# Altium PCB module-SMD-lora.PcbDoc
Units mm, origin at the board's own origin, x right, y up, seen from the top; angles counter-clockwise.
Board outline 20 x 20 mm, 4 copper layers (Top Layer, Int1, Int2, Bottom Layer), stack 1.546 mm thick; 29 components, 50 nets, 157 pads, 108 vias.
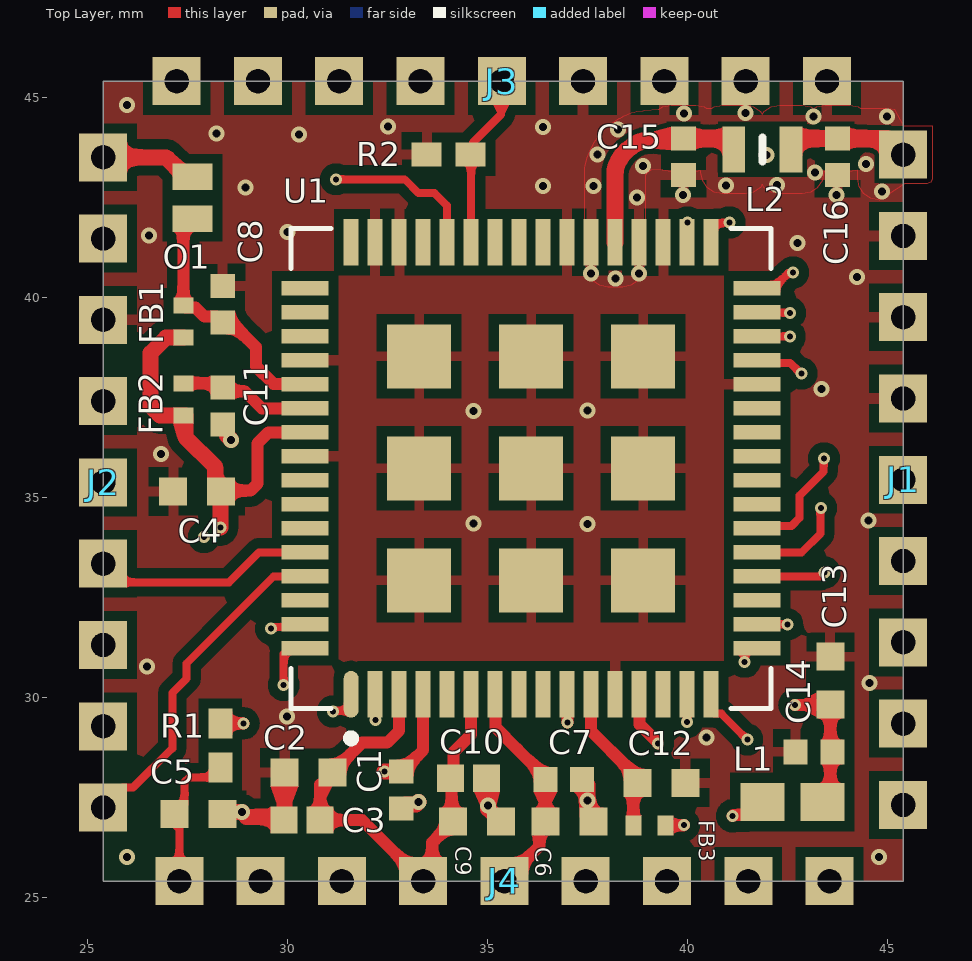
[diagram p0: Top Layer view]
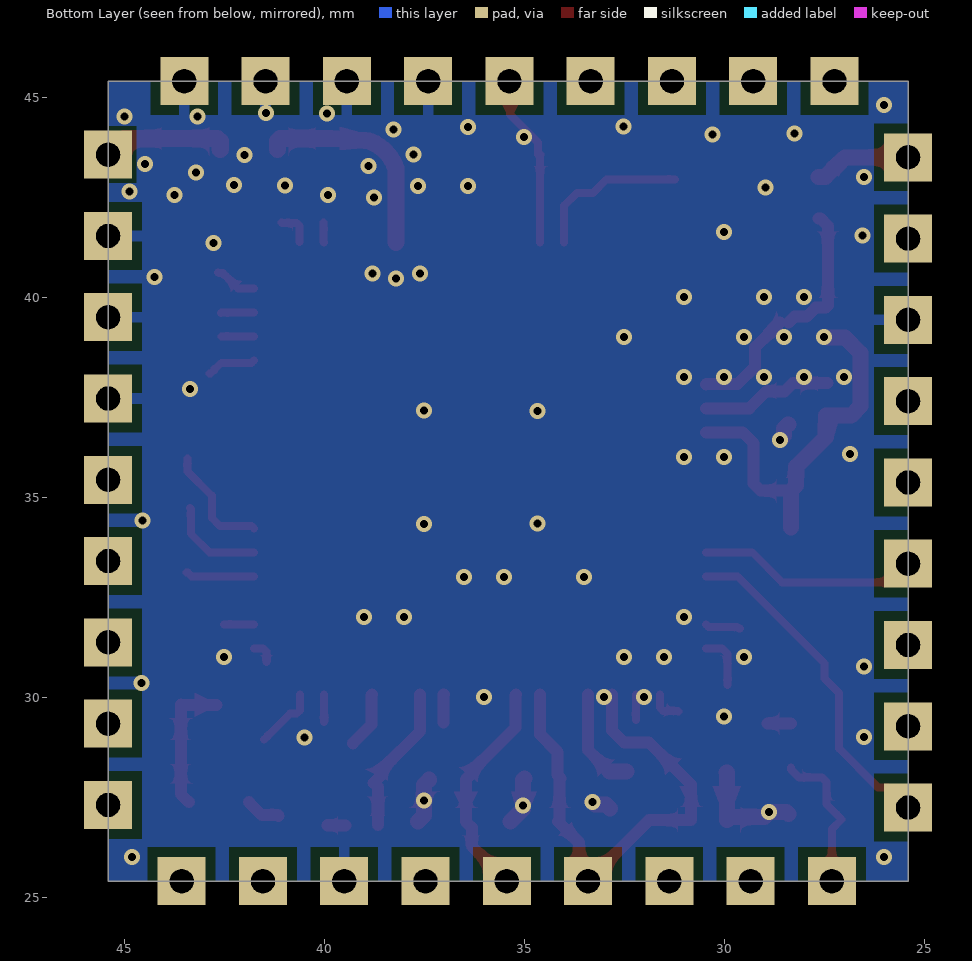
[diagram p1: Bottom Layer view, seen from below]
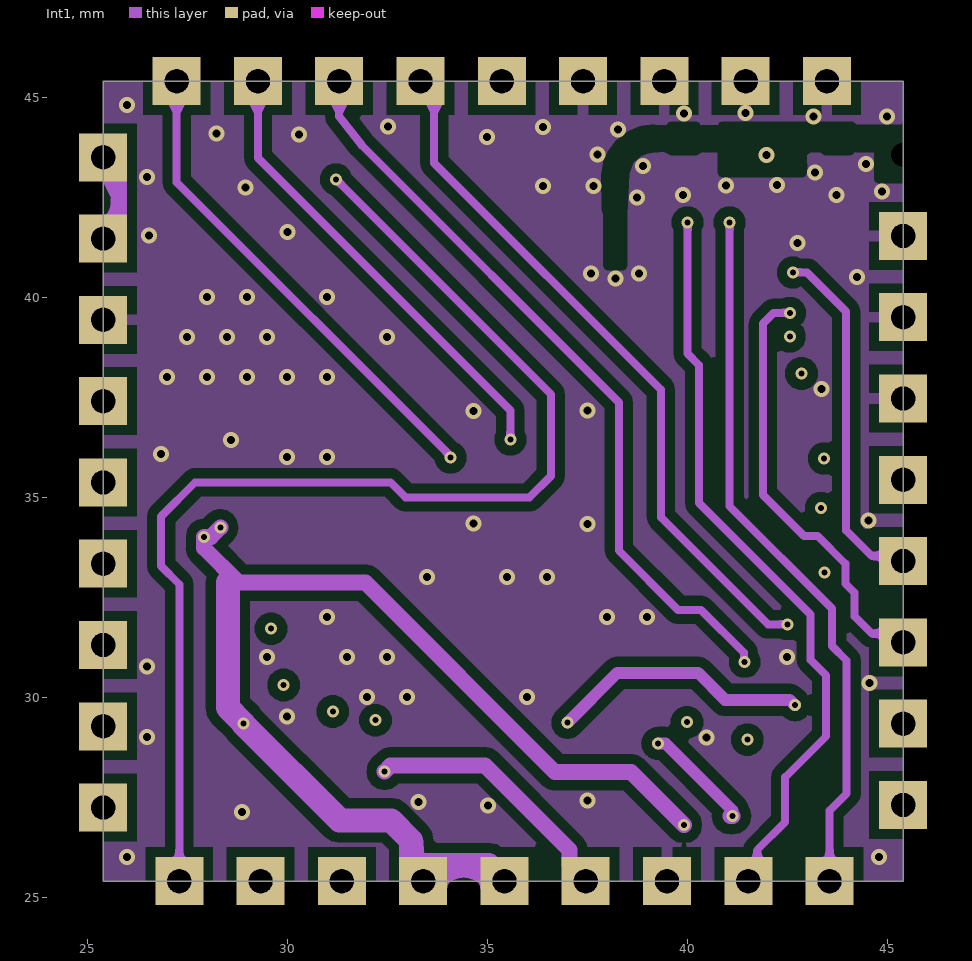
[diagram p2: Int1]
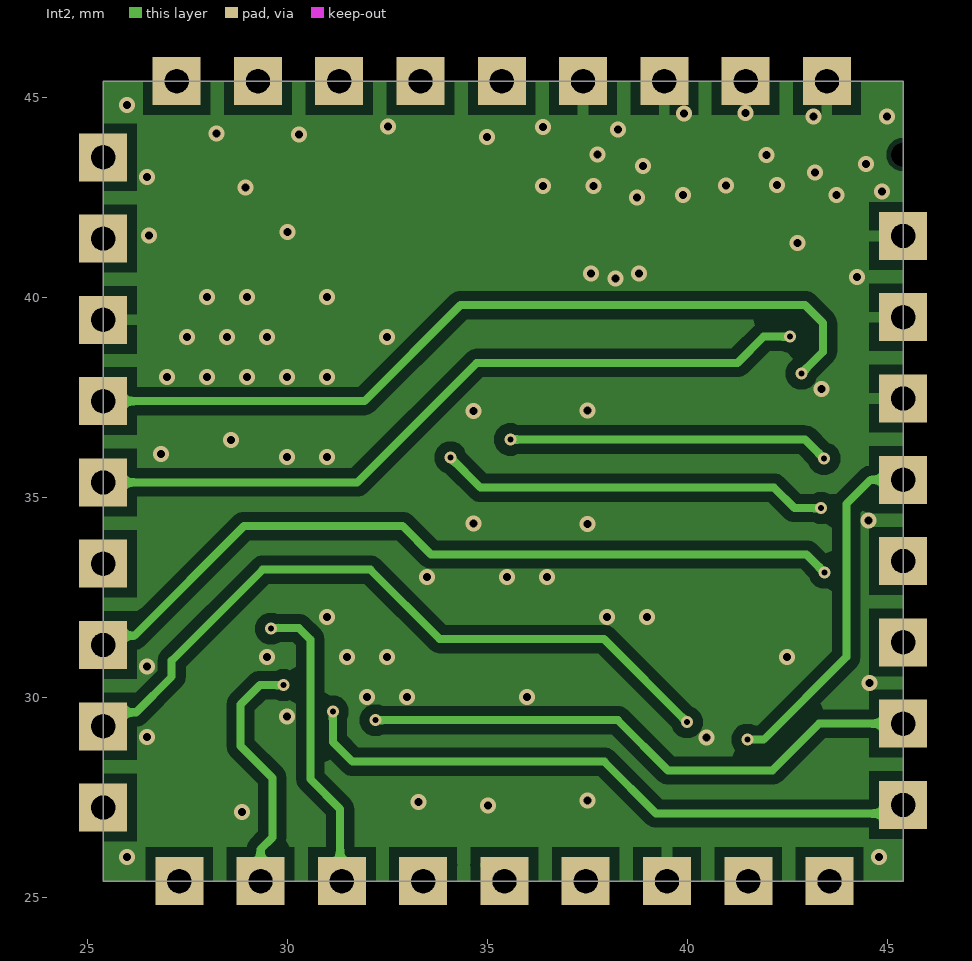
[diagram p3: Int2]

## Layer stack, top to bottom
Top Solder: solder mask 0.0254, SM-003, Dk 4
Top Layer: signal copper 0.035
Dielectric 1: prepreg 0.0705, PP-017, Dk 4
Int1: signal copper 0.035
Dielectric 2: core 1.265, Core-039, Dk 4.8
Int2: signal copper 0.035
Dielectric 3: prepreg 0.0705, PP-017, Dk 4
Bottom Layer: signal copper 0.035
Bottom Solder: solder mask 0.0254, SM-003, Dk 4

## Board outline
25.4,25.4 25.4,45.4 45.4,45.4 45.4,25.4

## Design rules (kind name [scope] priority, off if disabled: settings)
Clearance Clearance_50R [InNetClass('50Ohms')] p1: gap=0.12 ignorepadtopadclearanceinfootprint=TRUE
Clearance [All] p2: gap=0.254 ignorepadtopadclearanceinfootprint=TRUE
MaxMinImpedance "Schematic Impedance Constraint" [InNetClass('50Ohms')] p1: minimum=50.00 maximum=50.00
MinimumSolderMaskSliver [All] p1: minsoldermaskwidth=0.06
PlaneClearance PlaneClearance_GND [InNet('GND')] p1: clearance=0
PlaneClearance [All] p2: clearance=0.508
PlaneConnect PlaneConnect_GND [InNet('GND')] p1: pad.planeconnectstyle=Relief pad.reliefexpansion=0.508 pad.reliefentries=4 pad.reliefconductorwidth=0.254 pad.reliefairgap=0.254 via.planeconnectstyle=Direct via.reliefexpansion=0.508 via.reliefentries=4 via.reliefconductorwidth=0.254 via.reliefairgap=0.254
PlaneConnect [All] p2: planeconnectstyle=Relief reliefexpansion=0.508 reliefentries=4 reliefconductorwidth=0.254 reliefairgap=0.254
PolygonConnect PolygonConnect_GND [InNet('GND')] p1: thpad.connectstyle=Relief thpad.reliefconductorwidth=0.254 thpad.reliefentries=4 thpad.polygonreliefangle="90 Angle" thpad.airgapwidth=0.254 smdpad.connectstyle=Relief smdpad.reliefconductorwidth=0.254 smdpad.reliefentries=4 smdpad.polygonreliefangle="90 Angle" smdpad.airgapwidth=0.254 via.connectstyle=Direct via.reliefconductorwidth=0.254 via.reliefentries=4 via.polygonreliefangle="90 Angle" via.airgapwidth=0.254
PolygonConnect [All] p2: connectstyle=Relief reliefconductorwidth=0.254 reliefentries=4 polygonreliefangle="90 Angle" airgapwidth=0.254
RoutingVias [All] p1: holewidth=0.2 width=0.4 viastyle="Through Hole" minholewidth=0.2 minwidth=0.4 maxholewidth=0.8 maxwidth=1
SilkToSolderMaskClearance [IsPad] p1: minsilkscreentomaskgap=0.1 clearancetoexposedcopper=TRUE
SolderMaskExpansion SolderMaskExpansion_Via [IsVia] p1: expansion=0.102 istentingtop=TRUE
SolderMaskExpansion [All] p2: expansion=0.08 istentingtop=FALSE
SupplyNets "Schematic Supply Nets_4" [InNet('VBAT')] p1: voltage=0.000
SupplyNets "Schematic Supply Nets_3" [InNet('VDD')] p2: voltage=0.000
SupplyNets "Schematic Supply Nets_2" [InNet('VDD_EXTPA')] p3: voltage=0.000
SupplyNets "Schematic Supply Nets_1" [InNet('VDDPA')] p4: voltage=0.000
SupplyNets "Schematic Supply Nets" [InNet('GND')] p5: voltage=0.000
Width Width_50R [InNetClass('50Ohms')] p1: maxlimit=0.431 minlimit=0.063 preferedwidth=0.431 toplayer_minwidth=0.431 midlayer1_maxwidth=0.063 midlayer1_prefwidth=0.063 midlayer2_maxwidth=0.063 midlayer2_prefwidth=0.063 bottomlayer_minwidth=0.431 impedanceprofiledriven=TRUE impedanceprofileid={6F874B10-E554-4271-A9D5-4A3DC83E2545} impedanceprofilevalue=50.000000 minimp=50.000000 maximp=50.000000 favimp=50.000000
Width [All] p2: maxlimit=1 minlimit=0.15 preferedwidth=0.2 minimp=50.000000 maximp=50.000000 favimp=50.000000
26 further rules are at their usual default settings.

## Classes and differential pairs
net class 50Ohms: ANT_LORA RFOUT

## Components (designator, comment, footprint, x,y, rotation, side; value= is the part's Value field where it differs from the comment)
C1 "1uF" CAPC1005X55N 32.855,27.68 r90 top
C2 "GRM155R71C104KA88D" 0402 29.9,28.12 r0 top value=100nF
C3 "ZRB15XR61A475KE01D" CAPC1005X80N 30.375,26.925 r180 top value=4.7uF
C4 "GRM155R71C104KA88D" 0402 27.115,35.14 r0 top value=100nF
C5 "GRM155R71C104KA88D" 0402 28.42,27.072 r180 top value=100nF
C6 "GRM155R71C104KA88D" 0402 37.69,26.885 r180 top value=100nF
C7 "1uF" CAPC1005X55N 36.917,27.94 r180 top
C8 "1uF" CAPC1005X55N 28.39,39.82 r270 top
C9 "GRM155R71C104KA88D" 0402 35.38,26.885 r180 top value=100nF
C10 "ZRB15XR61A475KE01D" CAPC1005X80N 34.534,27.97 r0 top value=4.7uF
C11 "1uF" CAPC1005X55N 28.39,37.28 r90 top
C12 "GRM155R71C104KA88D" 0402 39.993,27.855 r180 top value=100nF
C13 "GRM155R71C104KA88D" 0402 43.58,31.045 r270 top value=100nF
C14 "LMK105ABJ474KV8F" CAPC1005X55N 43.17,28.63 r180 top value=470nF
C15 "GJM1555C1H3R3WB01D" CAPC1005X55N 39.91,43.507 r90 top value=3.3pF
C16 "GJM1555C1H3R3WB01D" CAPC1005X55N 43.76,43.507 r90 top value=3.3pF
FB1 "BLM15AG121SH1D" NFZ15SG152SN10B 27.406,39.385 r270 top
FB2 "BLM15AG121SH1D" NFZ15SG152SN10B 27.406,37.438 r270 top
FB3 "BLM15AG121SH1D" NFZ15SG152SN10B 39.065,26.785 r0 top
J1 "SMD castellated edge (Right)" 9POS_VIA_0.6#1 45.4,25.4 r0 top
J2 "SMD castellated edge (LEFT)" 9POS_VIA_0.6#2 25.4,45.4 r180 top
J3 "SMD castellated edge (Top)" 9POS_VIA_0.6#2 45.4,45.4 r90 top
J4 "SMD castellated edge (Bottom)" 9POS_VIA_0.6#2 25.4,25.4 r270 top
L1 "MLZ1608M150WT000" INDC1608X95N 42.63,27.375 r180 top value=15µH
L2 "LQW18AN8N2C80D" LQW18AN10NG80D 41.88,43.692 r0 top value=8.2nH
O1 "NO" SMT-JUMPER_2_NO_TRACE_SILK 27.635,42.485 r270 top net-tie
R1 "CRCW040210K0JNEDC" RESC1005X40N 28.33,28.795 r90 top value=10kR
R2 "CRCW040210K0JNEDC" RESC1005X40N 34.04,43.57 r180 top value=10kR
U1 "RAK3172-SIP" XCVR_RAK3172-SIP 36.1,35.72 r90 top

## Footprints (in the part's own frame and the unit in brackets; to place one, negate y for a bottom-side part, rotate by r counter-clockwise, add the part's x,y. Pads: shape width x height; smd on the part's side, far side on the other; paste and mask are expansions set on the pad)
9POS_VIA_0.6#1 [mm]
  rect 1.2x1.2 / inner rect 0x0 / far side rect 1.2x1.2 hole 0.6: 1(0,18.161)
  rect 1.2x1.2 hole 0.6: 2(0,16.129) 3(0,14.097) 4(0,12.065) 5(0,10.033) 6(0,8.001) 7(0,5.969) 8(0,3.937) 9(0,1.905)
9POS_VIA_0.6#2 [mm]
  rect 1.2x1.2 hole 0.6: 1(0,18.161) 2(0,16.129) 3(0,14.097) 4(0,12.065) 5(0,10.033) 6(0,8.001) 7(0,5.969) 8(0,3.937) 9(0,1.905)
0402 [mm]
  rect 0.7x0.7 smd: 1(0.035,0) 2(1.233,0)
  body extent -0.38,-0.36 1.65,0.36, height 0.82
CAPC1005X55N [mm]
  rect 0.6x0.62 smd: 1(-0.46,0) 2(0.46,0)
  body extent -0.5,-0.25 0.5,0.25, height 0.55
CAPC1005X80N [mm]
  rect 0.68x0.68 smd: 1(-0.45,0) 2(0.45,0)
  body extent -0.5,-0.25 0.5,0.25, height 0.8
INDC1608X95N [mm] "Chip Inductor, 2-Leads, Body 1.75x0.95x0.95mm (0603)"
  rect 1.1x0.95 smd: 1(-0.75,0) 2(0.75,0)
  body extent -0.8,-0.48 0.8,0.47, height 0.8
LQW18AN10NG80D [mm]
  rect 0.57x1.15 smd: 1(-0.715,0) 2(0.715,0)
  silkscreen extent 0,-0.3 0,0.3, body extent -0.82,-0.5 0.82,0.5, height 0.9
NFZ15SG152SN10B [mm]
  rect 0.4x0.5 smd: 1(-0.4,0) 2(0.4,0)
  body extent -0.5,-0.25 0.5,0.25, height 0.5
RESC1005X40N [mm]
  rect 0.75x0.6 smd: 1(-0.55,0) 2(0.55,0)
  body extent -0.49,-0.25 0.51,0.25, height 0.35
SMT-JUMPER_2_NO_TRACE_SILK [mil] "SMT-JUMPER_2_NC_TRACE_SILK"
  rect 26x39.37 smd paste+0: 1(-20.5,0) 2(20.5,0)
XCVR_RAK3172-SIP [mm]
  oval 1.17x0.37 smd: 1(-5.65,4.5)
  rect 1.17x0.37 smd: 2(-5.65,3.9) 3(-5.65,3.3) 4(-5.65,2.7) 5(-5.65,2.1) 6(-5.65,1.5) 7(-5.65,0.9) 8(-5.65,0.3) 9(-5.65,-0.3) 10(-5.65,-0.9) 11(-5.65,-1.5) 12(-5.65,-2.1) 13(-5.65,-2.7) 14(-5.65,-3.3) 15(-5.65,-3.9) 16(-5.65,-4.5) 33(5.65,-4.5) 34(5.65,-3.9) 35(5.65,-3.3) 36(5.65,-2.7) 37(5.65,-2.1) 38(5.65,-1.5) 39(5.65,-0.9) 40(5.65,-0.3) 41(5.65,0.3) 42(5.65,0.9) 43(5.65,1.5) 44(5.65,2.1) 45(5.65,2.7) 46(5.65,3.3) 47(5.65,3.9) 48(5.65,4.5)
  rect 0.37x1.17 smd: 17(-4.5,-5.65) 18(-3.9,-5.65) 19(-3.3,-5.65) 20(-2.7,-5.65) 21(-2.1,-5.65) 22(-1.5,-5.65) 23(-0.9,-5.65) 24(-0.3,-5.65) 25(0.3,-5.65) 26(0.9,-5.65) 27(1.5,-5.65) 28(2.1,-5.65) 29(2.7,-5.65) 30(3.3,-5.65) 31(3.9,-5.65) 32(4.5,-5.65) 49(4.5,5.65) 50(3.9,5.65) 51(3.3,5.65) 52(2.7,5.65) 53(2.1,5.65) 54(1.5,5.65) 55(0.9,5.65) 56(0.3,5.65) 57(-0.3,5.65) 58(-0.9,5.65) 59(-1.5,5.65) 60(-2.1,5.65) 61(-2.7,5.65) 62(-3.3,5.65) 63(-3.9,5.65) 64(-4.5,5.65)
  rect 1.6x1.6 smd: 65(-2.8,2.8) 66(0,2.8) 67(2.8,2.8) 68(-2.8,0) 69(0,0) 70(2.8,0) 71(-2.8,-2.8) 72(0,-2.8) 73(2.8,-2.8)
  silkscreen extent -6.85,-6 6,6

## Part data
C1 C7 C8 C11: library part GRM155Z71A105KE01J, "Multilayer Ceramic Capacitors MLCC - SMD/SMT 1.0UF 10V 10% 0402", Manufacturer 1=Murata, Manufacturer_Name="Murata Electronics", Mouser Part Number=81-GRM155Z71A105KE1J, Arrow Part Number=GRM155Z71A105KE01J, Arrow Price/Stock=https://www.arrow.com/en/products/grm155z71a105ke01j/murata-manufacturing?region=nac, Category 1="Ceramic Capacitors", Category 2="Ceramic Capacitors", Datasheet Link=http://www.murata.com/~/media/webrenewal/support/library/catalog/products/capacitor/mlcc/c02e.pdf, Description 1="Multi-Layer Ceramic Capacitor 1uF X7R 10% 0402 Paper T/R", Description 2="Multi-Layer Ceramic Capacitor 1uF X7R 10% 0402 Paper T/R", Height=0.55mm, Manufacturer 2=Murata, Manufacturer Part Number 1=GRM155Z71A105KE01J, Manufacturer Part Number 2=GRM155Z71A105KE01J, Manufacturer_Part_Number=GRM155Z71A105KE01J, Mouser Price/Stock=https://www.mouser.co.uk/ProductDetail/Murata-Electronics/GRM155Z71A105KE01J?qs=xZ%2FP%252Ba9zWqaF%2FmyRgV0iOA%3D%3D, Pricing 1="1=0,1, 10=0,069, 50=0,069, 100=0,031, 1000=0,018, 10000=0,013 (USD)", Pricing 2="1=0,1, 10=0,063, 50=0,0344, 100=0,0281, 500=0,02006, 1000=0,01577, 2500=0,01433, 5000=0,01319 (USD)", RoHS 1=Yes, RoHS 2=Yes, Stock 1=804340, Stock 2=80025, Supplier 1=Mouser, Supplier 2=Digi-Key, Supplier Part Number 1=81-GRM155Z71A105KE1J, Supplier Part Number 2=490-GRM155Z71A105KE01JCT-ND
C2 C4 C5 C6 C9 C12 C13: "Multilayer Ceramic Capacitors MLCC - SMD/SMT 0.1 uF 16 VDC 10% 0402 X7R", Capacitance=100nF, Case Code (Imperial)=0402, Case Code (Metric)=1005, Dielectric=X7R, Dielectric Material=Ceramic, Manufacturer=YAGEO, Manufacturer 1=Murata, Manufacturer_Part_Number=CC0402KRX7R7BB104, Max Operating Temperature=125°C, Min Operating Temperature=-55°C, Package=C0402, Package Quantity=1, Supplier Part Number 1=81-GRM155R71C104KA88, Tolerance=10%, Voltage=16V, Case/Package=0402, Category 1="Ceramic Capacitors", ComponentLink1Description=https://datasheet.ciiva.com/129/grm155r71c104ka88-01-129739.pdf?src-supplier=Digi-Key, ComponentLink1URL=https://datasheet.ciiva.com/129/grm155r71c104ka88-01-129739.pdf?src-supplier=Digi-Key, ComponentLink2Description=https://datasheet.ciiva.com/129/grm155r71c104ka88-01-129740.pdf?src-supplier=Digi-Key, ComponentLink2URL=https://datasheet.ciiva.com/129/grm155r71c104ka88-01-129740.pdf?src-supplier=Digi-Key, ComponentLink3Description=https://datasheet.ciiva.com/29199/454098-da-01-en-vs-kondensator-0402-29199799.pdf?src-supplier=Conrad, ComponentLink3URL=https://datasheet.ciiva.com/29199/454098-da-01-en-vs-kondensator-0402-29199799.pdf?src-supplier=Conrad, ComponentLink4Description=https://datasheet.ciiva.com/7937/4360-7937615.pdf?src-supplier=Element14, ComponentLink4URL=https://datasheet.ciiva.com/7937/4360-7937615.pdf?src-supplier=Element14, ComponentLink5Description=https://datasheet.ciiva.com/14116/grmseries-highdielectrictype-eng-14116878.pdf?src-supplier=Distrelec, ComponentLink5URL=https://datasheet.ciiva.com/14116/grmseries-highdielectrictype-eng-14116878.pdf?src-supplier=Distrelec, ComponentLink6Description=https://datasheet.ciiva.com/14103/grmseries-highdielectrictype-eng-14103750.pdf?src-supplier=Distrelec, ComponentLink6URL=https://datasheet.ciiva.com/14103/grmseries-highdielectrictype-eng-14103750.pdf?src-supplier=Distrelec, ComponentLink7Description=https://datasheet.ciiva.com/28534/4360-28534127.pdf?src-supplier=Element14, ComponentLink7URL=https://datasheet.ciiva.com/28534/4360-28534127.pdf?src-supplier=Element14, ComponentLink8Description=https://datasheet.ciiva.com/28534/4360-28534133.pdf?src-supplier=Element14, ComponentLink8URL=https://datasheet.ciiva.com/28534/4360-28534133.pdf?src-supplier=Element14, Depth=0.5mm, Description 1="0402 0.1 uF 16V ±10 % Tolerance X7R SMT Multilayer Ceramic Capacitor", Height=0.5mm, Lead Free="Lead Free", Length=1mm, Manufacturer Part Number 1=GRM155R71C104KA88D, Material=Ceramic, Mount="Surface Mount", Number of Pins=2, Packaging="Tape and Reel", Pricing 1="1=0,1, 10=0,017, 50=0,017, 100=0,01, 1000=0,008, 10000=0,005 (USD)", Radiation Hardening=No, Reach SVHC Compliant=Unknown, RoHS 1=Yes, RoHS Compliant=Yes, Series=GRM, Stock 1=7816691, Supplier 1=Mouser, Termination=SMD/SMT, Thickness=0.022inch, Voltage Rating=16V, Voltage Rating (DC)=16V, Width=0.02inch
C3 C10: "Multilayer Ceramic Capacitors MLCC - SMD/SMT 4.7 uF 10 VDC 10% 0402 X5R", Manufacturer_Name="Murata Electronics", Mouser Part Number=81-ZRB15XR61A475KE1D, Arrow Part Number=ZRB15XR61A475KE01D, Arrow Price/Stock=https://www.arrow.com/en/products/zrb15xr61a475ke01d/murata-manufacturing, Datasheet Link=https://componentsearchengine.com/Datasheets/1/ZRB15XR61A475KE01D.pdf, Height=0.8mm, Manufacturer_Part_Number=ZRB15XR61A475KE01D, Mouser Price/Stock=https://www.mouser.co.uk/ProductDetail/Murata-Electronics/ZRB15XR61A475KE01D?qs=I53XXhTNm8tY%252BZhQcsxAiQ%3D%3D
C14: "Multilayer Ceramic Capacitors MLCC - SMD/SMT  0.47uF 10V X5R 10% SMD 0402 85°C Paper T/R", Manufacturer 1="Taiyo Yuden", Supplier Part Number 1=963-LMK105ABJ474KV8F, Category 1="Ceramic Capacitors", Description 1="Capacitor Ceramic 0.47uF 10V X5R 10% SMD 0402 85°C Paper T/R", Manufacturer Part Number 1=LMK105ABJ474KV8F, Pricing 1="1=0,1, 10=0,06, 50=0,06, 100=0,028, 1000=0,016, 10000=0,014 (USD)", RoHS 1=Yes, Stock 1=26528, Supplier 1=Mouser
C15 C16: "Multilayer Ceramic Capacitors MLCC - SMD/SMT 3.3 pF 50 VDC 0.05 pF 0402 C0G (NP0)", Manufacturer_Name="Murata Electronics", Mouser Part Number=81-GJM1555C1H3R3WB1D, Datasheet Link=https://search.murata.co.jp/Ceramy/image/img/A01X/G101/ENG/GJM1555C1H3R3WB01-01A.pdf, Height=0.55mm, Manufacturer_Part_Number=GJM1555C1H3R3WB01D, Mouser Price/Stock=https://www.mouser.co.uk/ProductDetail/Murata-Electronics/GJM1555C1H3R3WB01D?qs=YLLXL5qGyDt2ejtN1v%252B1AA%3D%3D
FB1 FB2 FB3: "Ferrite Beads 120 OHM Alternate Sizing Guide Below", Manufacturer_Name="Murata Electronics", Mouser Part Number=81-BLM15AG121SH1D, Arrow Part Number=BLM15AG121SH1D, Arrow Price/Stock=https://www.arrow.com/en/products/blm15ag121sh1d/murata-manufacturing, Datasheet Link=http://www.murata.com/~/media/webrenewal/support/library/catalog/products/emc/emifil/c31e.ashx?la=en-gb, Height=0.55mm, Manufacturer_Part_Number=BLM15AG121SH1D, Mouser Price/Stock=https://www.mouser.co.uk/ProductDetail/Murata-Electronics/BLM15AG121SH1D?qs=%2F%252BYoplLUB5i4DkRkM50vHw%3D%3D
J1 J2 J3 J4: library part 9POS_CAST, "9 POS Castellated connector with VIA 0.6"
L1: "Inductor RF Shielded 15µH, ±5%", Case/Package=0603, DC Resistance (DCR)=1.5R, Inductance=15uH, Manufacturer=TDK, Manufacturer_Part_Number=MLZ2012M150W, Max Operating Temperature=125°C, Min Operating Temperature=-55°C, Saturation Current=70mA, Supplier Part Number 1=810-MLZ1608M150WT000, Test Frequency=2MHz, Tolerance=20%, Category 1="Fixed Inductors", Core Material=Ferrite, Description 1="Inductors For Decoupling Circuits, Multilayer Ferrite", Manufacturer 1=TDK, Manufacturer Part Number 1=MLZ1608M150WT000, Mount="Surface Mount", Pricing 1="1=0,15, 10=0,103, 50=0,103, 100=0,084, 1000=0,063, 10000=0,051 (USD)", RoHS 1=Yes, RoHS Compliant=Yes, Series=MLZ, Shielding=Shielded, Stock 1=10538, Supplier 1=Mouser
L2: "Inductor Wirewound , 8.2 nH, 52 Milliohm, ± 0.2nH, 4.75 GHz, 1.6 A, 0603 [1608 Metric]", Case Code (Imperial)=0603, Case Code (Metric)=1608, Current Rating=1.6A, DC Resistance (DCR)=52mR, Inductance=8.2nH, Manufacturer 1=Murata, Max Operating Temperature=125°C, Min Operating Temperature=-55°C, Package Quantity=4000, Self Resonant Frequency=4.75GHz, Supplier Part Number 1=490-12792-1-ND, Test Frequency=100MHz, Case/Package=0603, Category 1="Fixed Inductors", ComponentLink1Description=http://www.mouser.com/ds/2/281/murata_inductors-1115352.pdf?src-supplier=Mouser, ComponentLink1URL=http://www.mouser.com/ds/2/281/murata_inductors-1115352.pdf?src-supplier=Mouser, ComponentLink2Description=http://www.murata.com/~/media/webrenewal/support/library/catalog/products/inductor/chip/o05e.ashx?src-supplier=Digi-Key, ComponentLink2URL=http://www.murata.com/~/media/webrenewal/support/library/catalog/products/inductor/chip/o05e.ashx?src-supplier=Digi-Key, ComponentLink3Description=https://datasheet.octopart.com/LQW18AN8N2C80D-Murata-datasheet-142542943.pdf?src-supplier=Ciiva+Crawler, ComponentLink3URL=https://datasheet.octopart.com/LQW18AN8N2C80D-Murata-datasheet-142542943.pdf?src-supplier=Ciiva+Crawler, ComponentLink4Description=https://datasheet.octopart.com/LQW18AN8N2C80D-Murata-datasheet-141294533.pdf?src-supplier=Ciiva+Crawler, ComponentLink4URL=https://datasheet.octopart.com/LQW18AN8N2C80D-Murata-datasheet-141294533.pdf?src-supplier=Ciiva+Crawler, ComponentLink5Description=https://datasheet.octopart.com/LQW18AN8N2C80D-Murata-datasheet-140718063.pdf?src-supplier=Ciiva+Crawler, ComponentLink5URL=https://datasheet.octopart.com/LQW18AN8N2C80D-Murata-datasheet-140718063.pdf?src-supplier=Ciiva+Crawler, ComponentLink6Description=https://datasheet.octopart.com/LQW18AN8N2C80D-Murata-datasheet-138759090.pdf?src-supplier=Ciiva+Crawler, ComponentLink6URL=https://datasheet.octopart.com/LQW18AN8N2C80D-Murata-datasheet-138759090.pdf?src-supplier=Ciiva+Crawler, ComponentLink7Description=https://datasheet.octopart.com/LQW18AN8N2C80D-Murata-datasheet-145452284.pdf?src-supplier=Geoflip, ComponentLink7URL=https://datasheet.octopart.com/LQW18AN8N2C80D-Murata-datasheet-145452284.pdf?src-supplier=Geoflip, ComponentLink8Description=https://datasheet.octopart.com/LQW18AN8N2C80D-Murata-datasheet-142296119.pdf?src-supplier=Arrow.cn, ComponentLink8URL=https://datasheet.octopart.com/LQW18AN8N2C80D-Murata-datasheet-142296119.pdf?src-supplier=Arrow.cn, ComponentLink9Description=https://datasheet.octopart.com/LQW18AN8N2C80D-Murata-datasheet-20916938.pdf, ComponentLink9URL=https://datasheet.octopart.com/LQW18AN8N2C80D-Murata-datasheet-20916938.pdf, Core Material=Non-Magnetic, Description 1="Wirewound Inductor, 8.2 nH, 52 Milliohm, ± 0.2nH, 4.75 GHz, 1.6 A, 0603 [1608 Metric]", Height=0.9mm, Height - Seated (Max)=0.039inch, Length=0.065inch, Manufacturer Part Number 1=LQW18AN8N2C80D, Max DC Current=1.6A, Mount="Surface Mount", Packaging="Tape and Reel", Pricing 1="1=0,21, 10=0,191, 25=0,1696, 50=0,1442, 100=0,1273, 250=0,11664, 500=0,10604, 1000=0,08908 (USD)", Q Factor=38, RoHS Compliant=Yes, Series=LQW18AN_80, Shielding=Unshielded, Stock 1=3995, Supplier 1=Digi-Key, Termination=SMD/SMT, Width=0.039inch
O1: library part JUMPER-SMT_2_NO_TRACE_SILK_1, "Normally opened trace jumper     / This jumper has no trace between two pads so it's normally closed (NO).", DeviceName=_SILK, DeviceSetName=JUMPER-SMT_2_NC_TRACE, GateName_1=G$1, LibraryName=SparkFun-Jumpers, SymbolName_1=SMT-JUMPER_2_NC_TRACE
R1: library part CRCW040249K9FKED, "Thick Film Resistors - SMD 1/16watt 49.9Kohms 1%", Case/Package=343Case, Manufacturer="Vishay Semiconductors", Power Rating=63mW, Resistance=10kR, Supplier Part Number 1=71-CRCW040210K0JNEDC, Tolerance=5%, Voltage Rating=50V, Category="Chip SMD Resistors", ComponentLink1Description=http://www.vishay.com/docs/28773/crcwce3.pdf?src-supplier=Digikey, ComponentLink1URL=http://www.vishay.com/docs/28773/crcwce3.pdf?src-supplier=Digikey, ComponentLink2Description=https://datasheet.octopart.com/CRCW040210K0JNEDC-Vishay-datasheet-100063072.pdf?src-supplier=Future+Electronics, ComponentLink2URL=https://datasheet.octopart.com/CRCW040210K0JNEDC-Vishay-datasheet-100063072.pdf?src-supplier=Future+Electronics, Height=350um, Lead Free=5697LeadFree, Manufacturer Part Number=CRCW040210K0JNEDC, Pricing 1="1=0,1, 10=0,013, 50=0,013, 100=0,007, 1000=0,005, 10000=0,004 (USD)", RoHS=Yes, Stock 1=229087, Supplier 1=Mouser
R2: "Thick Film Resistors - SMD 1/16watt 10Kohms 5% Commercial Use", Case/Package=343Case, Manufacturer="Vishay Semiconductors", Power Rating=63mW, Resistance=10kR, Supplier Part Number 1=71-CRCW040210K0JNEDC, Tolerance=5%, Voltage Rating=50V, Category="Chip SMD Resistors", ComponentLink1Description=http://www.vishay.com/docs/28773/crcwce3.pdf?src-supplier=Digikey, ComponentLink1URL=http://www.vishay.com/docs/28773/crcwce3.pdf?src-supplier=Digikey, ComponentLink2Description=https://datasheet.octopart.com/CRCW040210K0JNEDC-Vishay-datasheet-100063072.pdf?src-supplier=Future+Electronics, ComponentLink2URL=https://datasheet.octopart.com/CRCW040210K0JNEDC-Vishay-datasheet-100063072.pdf?src-supplier=Future+Electronics, Height=350um, Lead Free=5697LeadFree, Manufacturer Part Number=CRCW040210K0JNEDC, Pricing 1="1=0,1, 10=0,013, 50=0,013, 100=0,007, 1000=0,005, 10000=0,004 (USD)", RoHS=Yes, Stock 1=229087, Supplier 1=Mouser
U1: "RAK3172-SiP is a low-power long-range transceiver based on STM32WLE5 SoC in a System-in-Package form factor.", Package=Package, Availability="Not in stock", Check_prices=https://www.snapeda.com/parts/RAK3172-SiP/RAK/view-part/?ref=eda, MF=RAK, MP=RAK3172-SiP, Price=None, SnapEDA_Link=https://www.snapeda.com/parts/RAK3172-SiP/RAK/view-part/?ref=snap

## Via types
v1: diameter 0.4, hole 0.2, Top Layer to Bottom Layer, tented both sides, 49 vias
v2: diameter 0.4, hole 0.2, Int1 to Bottom Layer, tented both sides, 30 vias
v3: diameter 0.3, hole 0.15, Top Layer to Int1, tented both sides, 16 vias
v4: diameter 0.3, hole 0.15, Top Layer to Int2, tented both sides, 11 vias
v5: diameter 0.3, hole 0.15, Int1 to Int2, tented both sides, 2 vias

## Nets (pads, with @x,y where several pads share a name; then routed paths per layer and width w, separated by ;. In a path a pad name is that pad's centre, name@x,y a point inside that pad or via, vN(x,y) a via of type N, cw(c..) or ccw(c..) an arc to the next point about the centre after c; other vN are vias at no path point)
ANT_LORA: C16.2 J1.1 L2.2 | length 3.2
  Top Layer w0.431: L2.2 42.595,43.898 42.665,43.967 C16.2 44.993,43.967 J1.1
BOOT0: J3.5 R2.1 U1.43 | length 4.3
  Top Layer w0.2: R2.1 34.6,43.56 U1.43 ; R2.1@34.65,43.57 34.65,43.867 35.351,44.568 35.351,45.384 J3.5
GND: C1.1 C2.1 C3.2 C4.1 C5.1 C6.1 C7.1 C8.1 C9.1 C10.2 C11.1 C12.1 C13.1 C14.2 C15.1 C16.1 J1.2 J1.3 J1.4 J2.7 J3.6 J3.7 J3.8 J3.9 J4.3 R2.2 U1.12 U1.28 U1.35 U1.36 U1.38 U1.39 U1.46 U1.47 U1.52 U1.56 U1.65 U1.66 U1.67 U1.68 U1.69 U1.70 U1.71 U1.72 U1.73 | length 6.2
  Top Layer w0.4: C5.1 28.435,27.122 v1(28.872,27.122) 28.985,27.008 29.842,27.008 C3.2 29.93,26.93 29.93,28.115 C2.1 ; C11.1 28.4,36.82 28.5,36.72 28.5,36.536 v1(28.603,36.434) ; C1.1 32.955,27.32 33.222,27.32 v1(33.287,27.384) ; C10.2 35.024,27.93 v1(35.024,27.29) 35.024,27.206 C9.1 ; C7.1 37.377,27.93 37.505,27.802 37.505,27.035 C6.1
  other v1: 26,26 44.8,26 37.505,27.419 40.49,28.993 30.002,29.513 44.562,30.355 26.5,30.76 34.665,34.34 37.507,34.328 44.54,34.409 26.847,36.083 34.661,37.149 37.507,37.161 43.355,37.7 38.207,40.461 44.245,40.505 37.602,40.593 38.793,40.593 42.76,41.355 26.545,41.54 30.005,41.625 38.746,42.497 39.901,42.547 43.736,42.558 44.869,42.635 28.965,42.74 36.4,42.776 37.654,42.776 40.978,42.791 42.248,42.803 43.201,43.111 38.892,43.283 44.474,43.33 37.761,43.569 41.984,43.559 30.295,44.065 28.24,44.095 38.269,44.187 36.4,44.25 32.517,44.271 43.162,44.51 44.993,44.513 39.926,44.588 41.454,44.597 26,44.8
  other v2: 26.5,29 32,30 33,30 36,30 29.5,31 31.5,31 32.5,31 42.5,31 31,32 38,32 39,32 33.5,33 35.5,33 36.5,33 30,36 31,36 27,38 28,38 29,38 30,38 31,38 27.5,39 28.5,39 29.5,39 32.5,39 28,40 29,40 31,40 26.5,43 35,44
NetC11_2: C11.2 FB2.1 U1.54 | length 3.3
  Top Layer w0.3: FB2.1@27.418,37.85 28.28,37.85 28.485,37.645 28.942,37.645 29.367,37.22 U1.54
NetC12_2: C12.2 FB3.1 U1.11 | length 3.8
  Top Layer w0.3: U1.11 37.6,29.15 38.56,28.19 38.56,28.055 C12.2 38.653,27.748 FB3.1@38.653,26.797
NetC13_2: C13.2 C14.1 L1.1 U1.10 | length 10.7
  Top Layer w0.3: U1.10 37.01,30.06 v3(37.01,29.36) ; v3(42.695,29.8) 42.701,29.806 43.574,29.806 C13.2 43.58,27.575 L1.1
  Int1 w0.3: v3(37.01,29.36) 38.255,30.605 40.275,30.605 40.947,29.933 42.562,29.933 v3(42.695,29.8)
NetL1_2: L1.2 U1.13 | length 5.1
  Top Layer w0.3: U1.13 38.811,30.059 38.811,29.318 39.271,28.858 v3(39.271,28.842) ; v3(41.137,27.029) 41.158,27.05 41.555,27.05 L1.2
  Int1 w0.3: v3(39.271,28.842) 39.457,28.842 41.137,27.163 v3(41.137,27.029)
  Int1 w0.4: v3@41.084,27.029 v3(41.137,27.029)
NRST: C5.2 J4.9 R1.1 U1.44 | length 37.2
  Top Layer w0.2: J4.9 27.305,26.7 27.06,26.945 C5.2 27.437,27.322 27.437,27.875 27.554,27.992 28.13,27.992 28.33,28.192 R1.1 ; v3(31.221,42.945) 32.939,42.945 33.279,42.606 33.679,42.606 34,42.285 U1.44
  Int1 w0.2: J4.9 27.305,32.82 26.85,33.275 26.85,34.518 27.702,35.37 32.585,35.37 32.965,34.99 36.055,34.99 36.595,35.53 36.595,37.571 v3(31.221,42.945)
PA2: J2.6 U1.29 | length 21.9
  Top Layer w0.2: U1.29 41.811,38.359 42.569,38.359 42.834,38.094 v4(42.861,38.094)
  Int2 w0.2: J2.6 31.934,37.399 34.336,39.801 42.949,39.801 43.4,39.35 43.4,38.633 v4(42.861,38.094)
PA3: J2.5 U1.30 | length 19.5
  Top Layer w0.2: U1.30 v4@42.56,39.02
  Int2 w0.2: J2.5 31.752,35.367 34.74,38.355 41.258,38.355 41.916,39.013 v4(42.567,39.013)
PA4: J1.7 U1.31 | length 11.6
  Top Layer w0.2: U1.31 41.757,39.613 42.567,39.613 v3(42.575,39.605)
  Int1 w0.2: v3(42.575,39.605) 42.16,39.605 41.894,39.339 41.894,35.056 42.925,34.025 43.265,34.025 43.955,33.335 43.955,32.84 44.185,32.61 44.185,32.02 44.617,31.588 45.181,31.588 J1.7
PA5: J1.6 U1.32 | length 10
  Top Layer w0.2: U1.32 42.15,40.22 42.527,40.597 42.629,40.597 v3(42.648,40.617)
  Int1 w0.2: v3(42.648,40.617) 42.998,40.617 43.975,39.64 43.975,34.171 44.617,33.529 45.272,33.529 J1.6
PA6: J4.1 U1.33 | length 18.7
  Top Layer w0.2: U1.33@40.61,41.38 40.61,41.78 40.685,41.855 41.05,41.855 v3(41.063,41.869)
  Int1 w0.2: v3(41.063,41.869) 41.063,34.774 43.624,32.213 43.624,31.277 43.99,30.911 43.99,27.59 43.561,27.161 J4.1
PA7: J4.2 U1.34 | length 19.2
  Top Layer w0.2: U1.34 40.01,41.38 v3(40.01,41.866)
  Int1 w0.2: v3(40.01,41.866) 40.01,38.589 40.3,38.298 40.3,34.852 43.085,32.067 43.085,30.934 43.476,30.543 43.476,29.022 42.452,27.998 42.452,26.88 41.755,26.183 41.755,25.626 J4.2
PA8: U1.51
PA9: U1.50
PA10: U1.62
PA11: J4.7 U1.63 | length 8.4
  Top Layer w0.2: v4(29.598,31.709) 29.625,31.709 29.675,31.759 30.389,31.759 U1.63
  Int2 w0.2: v4(29.598,31.709) 29.617,31.728 30.292,31.728 30.58,31.44 30.58,27.95 31.325,27.205 31.325,25.444 J4.7
PA12: J4.8 U1.64 | length 7.5
  Top Layer w0.2: v4(29.914,30.301) 29.914,31.084 30.05,31.22 U1.64
  Int2 w0.2: J4.8 29.337,26.197 29.632,26.492 29.632,27.979 28.835,28.776 28.835,29.815 29.321,30.301 v4(29.914,30.301)
PA13: J1.9 U1.1 | length 16.7
  Top Layer w0.2: v4(31.141,29.637) 31.16,29.656 31.521,29.656 31.6,29.735 U1.1
  Int2 w0.2: v4(31.141,29.637) 31.141,28.879 31.635,28.385 37.93,28.385 39.225,27.09 45.185,27.09 J1.9
PA14: J1.8 U1.2 | length 14.8
  Top Layer w0.2: U1.2 32.204,30.066 32.204,29.426 v4(32.207,29.422)
  Int2 w0.2: v4(32.207,29.422) 38.268,29.422 39.525,28.165 42.13,28.165 43.302,29.337 J1.8
PA15: U1.8
PB1: U1.57
PB2: U1.58
PB3: U1.14
PB4: J2.2 U1.15 | length 18.7
  Top Layer w0.2: v4(40,29.372) U1.15
  Int2 w0.2: J2.2 25.747,29.618 26.223,29.618 27.115,30.51 27.115,30.91 29.39,33.185 32.08,33.185 33.815,31.45 37.922,31.45 v4(40,29.372)
PB5: J1.5 U1.16 | length 10.4
  Top Layer w0.2: U1.16 40.6,29.67 40.685,29.585 40.856,29.585 v4(41.505,28.936)
  Int2 w0.2: v4(41.505,28.936) 41.916,28.936 43.98,31 43.98,34.825 44.588,35.433 J1.5
PB6: J3.3 U1.17 | length 19.6
  Top Layer w0.2: v3(41.44,30.883) 41.44,31.135 41.525,31.22 U1.17
  Int1 w0.2: J3.3 31.303,44.517 31.881,43.783 38.295,37.369 38.295,33.66 39.774,32.181 40.349,32.181 41.42,31.11 41.42,30.902 v3(41.44,30.883)
PB7: J3.4 U1.18 | length 18.4
  Top Layer w0.2: U1.18 v3(42.505,31.82)
  Int1 w0.2: J3.4 33.675,45.06 33.675,43.357 39.345,37.687 39.345,34.495 42.02,31.82 v3(42.505,31.82)
PB8: U1.19
PB9: J2.3 U1.20 | length 21.2
  Top Layer w0.2: U1.20 43.313,33.02 43.408,33.115 v4(43.435,33.115)
  Int2 w0.2: J2.3@25.62,31.385 25.771,31.536 26.183,31.536 28.922,34.275 32.89,34.275 33.6,33.565 42.985,33.565 v4(43.435,33.115)
PB10: U1.49
PB11: U1.48
PB12: U1.59
PB13: J2.4 U1.60 | length 5.6
  Top Layer w0.2: J2.4 25.864,32.871 28.549,32.871 29.298,33.62 U1.60
PB14: J2.1 U1.61 | length 8.5
  Top Layer w0.2: J2.1 25.9,27.739 26.016,27.739 26.017,27.74 26.15,27.74 27.13,28.72 27.13,30.104 27.49,30.464 27.49,30.845 29.665,33.02 U1.61
PB15: U1.9
PC0: J3.1 U1.21 | length 24.5
  Top Layer w0.2: U1.21 42.865,33.62 43.331,34.086 43.331,34.708 v4(43.35,34.728)
  Int1 w0.2: J3.1 27.239,42.868 34.031,36.076 34.031,36.065 34.081,36.015 v5(34.081,35.988)
  Int2 w0.2: v5(34.081,35.988) 34.834,35.235 42.176,35.235 42.683,34.728 v4(43.35,34.728)
PC1: J3.2 U1.22 | length 22.5
  Top Layer w0.2: U1.22 41.811,34.281 42.608,34.281 42.808,34.482 42.808,35.035 43.415,35.642 43.415,35.96 v4(43.42,35.965)
  Int1 w0.2: J3.2 29.271,43.479 35.581,37.169 v5(35.581,36.44)
  Int2 w0.2: v5(35.581,36.44) 42.945,36.44 v4(43.42,35.965)
PC2: U1.23
PC3: U1.24
PC4: U1.25
PC5: U1.26
PC6: U1.27
PC13: U1.5
RFOUT: C15.2 L2.1 U1.37 | length 5.3
  Top Layer w0.431: U1.37 38.2,43.118 cw(c38.631,43.118) 38.202,43.164 ccw(c37.67,43.221) 38.203,43.171 cw(c38.632,43.129) 38.225,43.271 cw(c39.149,42.944) 38.619,43.769 38.717,43.832 cw(c39.007,43.381) 38.975,43.916 39.815,43.965 C15.2 L2.1@41.095,43.967 ; L2.1 L2.1@41.165,43.898
VBAT: C1.2 J4.4 U1.4 | length 9.1
  Top Layer w0.3: C1.2@32.865,28.14 33.4,28.675 U1.4
  Top Layer w0.4: v3(32.435,28.139) 32.864,28.139 C1.2@32.865,28.14
  Int1 w0.4: v3(32.435,28.139) 32.589,28.293 34.946,28.293 37.065,26.174 37.065,25.8 J4.4
VDD: C2.2 C3.1 C4.2 C6.2 C7.2 C9.2 C10.1 FB1.2 FB2.2 FB3.2 J4.5 J4.6 R1.2 U1.3 U1.6 U1.7 U1.55 | length 58.4
  Top Layer w0.3: R1.2 v3(28.911,29.345) ; C4.2@28.369,35.161 29.084,35.161 29.26,35.336 29.26,36.345 29.535,36.62 U1.55 ; U1.3 32.8,29.16 32.5,28.86 31.873,28.86 C2.2 30.825,27.812 C3.1 31.876,26.925 J4.6 33.626,25.625 33.626,26.364 C9.2 34.116,26.916 34.116,27.939 C10.1 34.164,28.05 34.164,28.629 34.6,29.065 U1.6 ; U1.7 35.211,30.059 35.211,29.246 35.758,28.699 36.307,28.15 36.307,28.09 C7.2 C6.2 36.307,26.735 36.307,26.274 J4.5 ; FB3.2 39.475,26.795 39.91,26.795 v3(39.92,26.805)
  Top Layer w0.4: FB2.2 26.825,37.038 26.59,37.272 26.59,38.603 26.972,38.985 FB1.2 ; FB2.2@27.456,37.038 27.456,36.502 28.198,35.76 28.198,35.29 C4.2 28.33,35.122 v3(28.33,34.24)
  Int1 w0.4: v3(28.33,34.24) 28.093,34.003 v3(27.923,34.003) 27.923,33.727 28.79,32.86 ; 28.517,32.86 28.79,32.86 ; v3(39.92,26.805) 38.6,28.125 36.697,28.125 31.962,32.86 28.79,32.86
  Int1 w0.6: 28.517,32.86 28.517,29.739 v3(28.911,29.345) 28.915,29.341 28.915,29.32 31.315,26.92 32.596,26.92 33.101,26.416 J4.6@33.101,25.982 ; J4.6 33.101,25.7 J4.6@33.101,25.982 ; J4.5@35.033,25.8 33.283,25.8 J4.6@33.101,25.982
  Int2 w0.4: J4.6 J4.6@33.801,25.8 ; J4.5@35.033,25.8 J4.5
VDD_EXTPA: J2.8 J2.9 O1.1 | length 4.8
  Top Layer w0.4: J2.9 26.976,43.495 27.465,43.006 O1.1
  Int1 w0.4: J2.8 25.795,41.858 25.795,43.1 J2.9
VDDPA: C8.2 FB1.1 O1.2 U1.53 | length 6.2
  Top Layer w0.3: O1.2 27.586,41.964 27.406,41.784 FB1.1 27.456,39.735 27.711,39.735 27.936,39.51 28.24,39.51 C8.2 ; C8.2@28.6,39.36 28.61,39.36 29.223,38.747 29.223,38.267 29.659,37.831 30.439,37.831 U1.53
pads on no net: U1.40 U1.41 U1.42 U1.45

## Polygon pours and split planes (outlines as drawn)
GND on Bottom Layer "GND_BOTTOM" (solid, pour order 4): 25.4,25.4 45.4,25.4 45.4,45.4 25.4,45.4
GND on Int1 "GND_INT1" (solid, pour order 3): 25.4,25.4 45.4,25.4 45.4,45.4 25.4,45.4
GND on Int2 "GND_INT2" (solid, remove dead copper, pour order 2): 25.4,25.4 45.4,25.4 45.4,45.4 25.4,45.4
GND on Top Layer "Top Layer-GND" (solid, pour order 5): 44.275,44.762 44.334,44.722 44.993,44.722 45.045,44.712 45.098,44.712 45.177,44.696 45.4,44.285 46.124,44.285 46.124,44.157 46.124,43.873 46.124,42.961 46.088,42.873 46,42.837 45.446,42.837 44.8,42.426 44.595,42.466 44.421,42.582 44.305,42.756 44.264,42.961 44.264,43.171 44.07,43.132 43.45,43.132 43.415,43.139 43.415,43.117 43.375,42.913 43.259,42.739 43.085,42.623 42.88,42.582 42.31,42.582 42.105,42.623 41.931,42.739 41.88,42.816 41.829,42.739 41.655,42.623 41.45,42.582 40.88,42.582 40.675,42.623 40.501,42.739 40.385,42.913 40.345,43.117 40.345,43.157 40.22,43.132 39.6,43.132 39.395,43.173 39.38,43.183 39.094,43.166 39.093,43.166 39.074,43.162 39.067,43.154 38.995,43.099 38.96,43.053 38.955,43.041 38.955,41.37 38.945,41.318 38.945,41.266 38.928,41.181 38.92,41.163 38.92,40.785 38.88,40.58 38.764,40.406 38.59,40.29 38.385,40.25 38.015,40.25 37.81,40.29 37.636,40.406 37.52,40.58 37.48,40.785 37.48,41.163 37.472,41.181 37.455,41.266 37.455,41.318 37.445,41.37 37.445,43.075 37.436,43.118 37.447,43.169 37.447,43.219 37.446,43.228 37.445,43.242 37.444,43.245 37.452,43.268 37.452,43.292 37.453,43.297 37.468,43.333 37.491,43.449 37.505,43.484 37.511,43.521 37.526,43.547 37.526,43.548 37.61,43.752 37.649,43.81 37.68,43.873 37.872,44.123 37.925,44.169 37.971,44.222 38.175,44.378 38.195,44.388 38.211,44.404 38.309,44.467 38.325,44.473 38.365,44.493 38.423,44.532 38.606,44.607 38.674,44.621 38.741,44.643 38.892,44.663 38.905,44.663 38.931,44.669 39.288,44.69 39.395,44.762 39.6,44.803 40.22,44.803 40.425,44.762 40.484,44.722 40.616,44.722 40.675,44.762 40.88,44.803 41.45,44.803 41.655,44.762 41.829,44.646 41.88,44.569 41.931,44.646 42.105,44.762 42.31,44.803 42.88,44.803 43.085,44.762 43.144,44.722 43.186,44.722 43.245,44.762 43.45,44.803 44.07,44.803
GND on Top Layer "GND_TOP" (solid, pour order 1): 25.4,25.4 45.4,25.4 45.4,45.4 25.4,45.4

## Other copper
Top Layer:
  pour cut-out: 41.538,44.355 41.574,44.267 41.574,43.117 41.538,43.029 41.45,42.993 40.88,42.993 40.792,43.029 40.756,43.117 40.756,43.623 40.326,43.623 40.308,43.579 40.22,43.543 39.6,43.543 39.512,43.579 39.503,43.602 39.02,43.574 39.013,43.569 38.935,43.553 38.91,43.536 38.909,43.536 38.908,43.535 38.886,43.531 38.823,43.491 38.817,43.48 38.702,43.392 38.601,43.261 38.557,43.155 38.552,43.127 38.552,43.126 38.551,43.125 38.551,43.124 38.549,43.121 38.55,43.115 38.546,43.094 38.544,43.09 38.544,41.37 38.539,41.358 38.542,41.346 38.525,41.262 38.511,41.241 38.509,41.232 38.509,40.785 38.473,40.697 38.385,40.661 38.015,40.661 37.927,40.697 37.891,40.785 37.891,41.232 37.889,41.241 37.875,41.262 37.858,41.346 37.861,41.358 37.856,41.37 37.856,43.097 37.847,43.118 37.852,43.13 37.85,43.142 37.858,43.184 37.853,43.201 37.854,43.203 37.854,43.204 37.856,43.207 37.855,43.212 37.856,43.216 37.867,43.233 37.894,43.369 37.899,43.376 37.898,43.385 37.908,43.396 37.918,43.422 37.919,43.424 37.92,43.426 37.99,43.595 38.002,43.607 38.006,43.623 38.198,43.873 38.212,43.881 38.221,43.896 38.425,44.052 38.43,44.054 38.433,44.058 38.531,44.121 38.534,44.121 38.552,44.136 38.569,44.14 38.58,44.152 38.763,44.228 38.78,44.228 38.794,44.236 38.92,44.253 38.931,44.255 38.936,44.255 38.94,44.255 38.951,44.257 38.955,44.259 39.485,44.29 39.512,44.355 39.6,44.392 40.22,44.392 40.308,44.355 40.326,44.311 40.774,44.311 40.792,44.355 40.88,44.392 41.45,44.392
  pour cut-out: 44.158,44.355 44.176,44.311 44.993,44.311 45.005,44.307 45.018,44.309 45.06,44.301 45.102,44.292 45.112,44.285 46,44.285 46.088,44.249 46.124,44.161 46.124,42.961 46.088,42.873 46,42.837 44.8,42.837 44.712,42.873 44.675,42.961 44.675,43.623 44.176,43.623 44.158,43.579 44.07,43.543 43.45,43.543 43.362,43.579 43.344,43.623 43.004,43.623 43.004,43.117 42.968,43.029 42.88,42.993 42.31,42.993 42.222,43.029 42.186,43.117 42.186,44.267 42.222,44.355 42.31,44.392 42.88,44.392 42.968,44.355 42.986,44.311 43.344,44.311 43.362,44.355 43.45,44.392 44.07,44.392
  pour cut-out: 40.88,44.392 42.595,44.392 42.595,42.993 40.88,42.993
Int1:
  pour cut-out: 38.015,40.66 37.923,40.692 37.889,40.786 37.885,42.074 37.854,42.182 37.844,43.06 37.898,43.426 38.015,43.66 38.21,43.921 38.38,44.051 38.488,44.133 38.542,44.16 38.809,44.268 38.853,44.278 39.169,44.319 39.215,44.312 39.492,44.312 39.51,44.357 39.604,44.395 40.221,44.395 40.31,44.357 40.328,44.312 40.773,44.312 40.792,44.357 40.88,44.393 41.459,44.395 42.882,44.399 44.129,44.402 44.237,44.319 45.011,44.319 45.4,44.312 45.4,42.832 44.801,42.832 44.702,42.869 44.672,42.932 44.666,43.615 44.184,43.621 44.182,43.587 44.071,43.533 43.452,43.533 43.36,43.579 43.342,43.615 43.008,43.615 43.015,43.135 42.969,43.025 42.903,42.99 41.511,42.982 40.882,42.99 40.788,43.025 40.751,43.103 40.751,43.615 40.397,43.621 40.225,43.533 39.598,43.533 39.43,43.619 39.322,43.621 39.155,43.615 39.01,43.587 38.849,43.517 38.671,43.361 38.56,43.08 38.515,42.09 38.51,40.786 38.474,40.698 38.4,40.66

## Silkscreen, mask and mechanical layers (free items; w line width, h text height)
Mechanical 1:
  the board outline again, w0.3